# EAGLE board PCB (EAGLE 9.7.0)
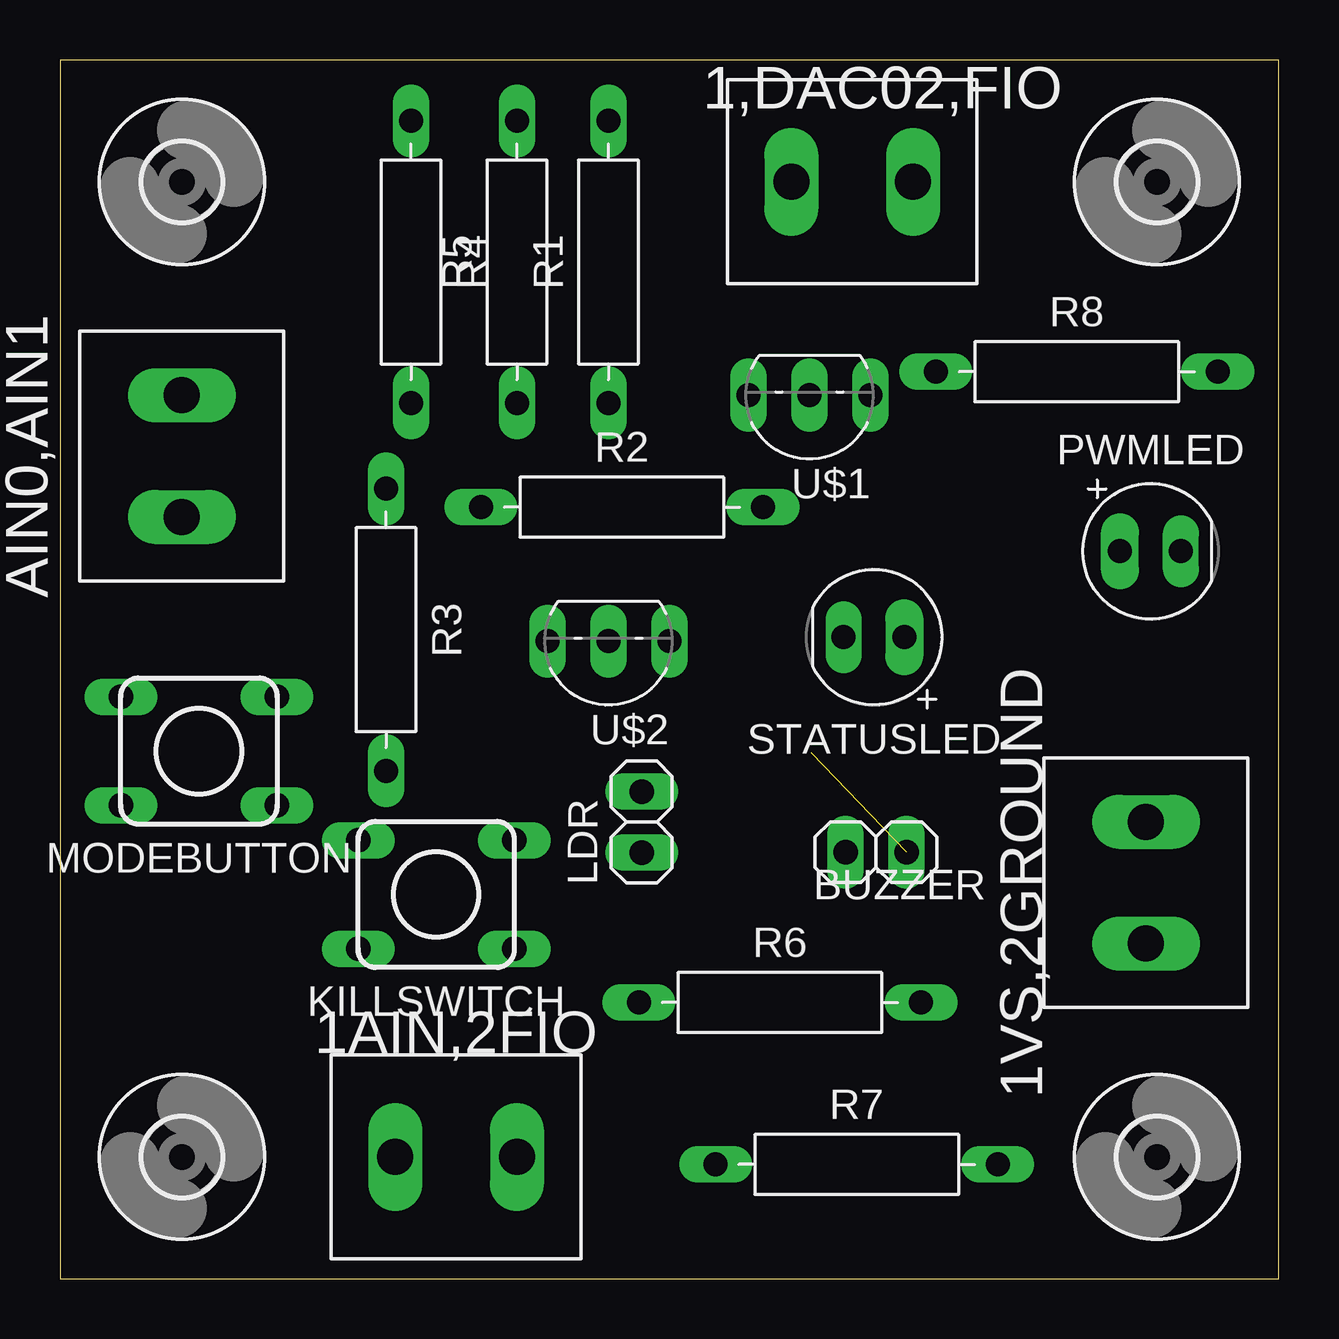
[diagram p0: board, top side]
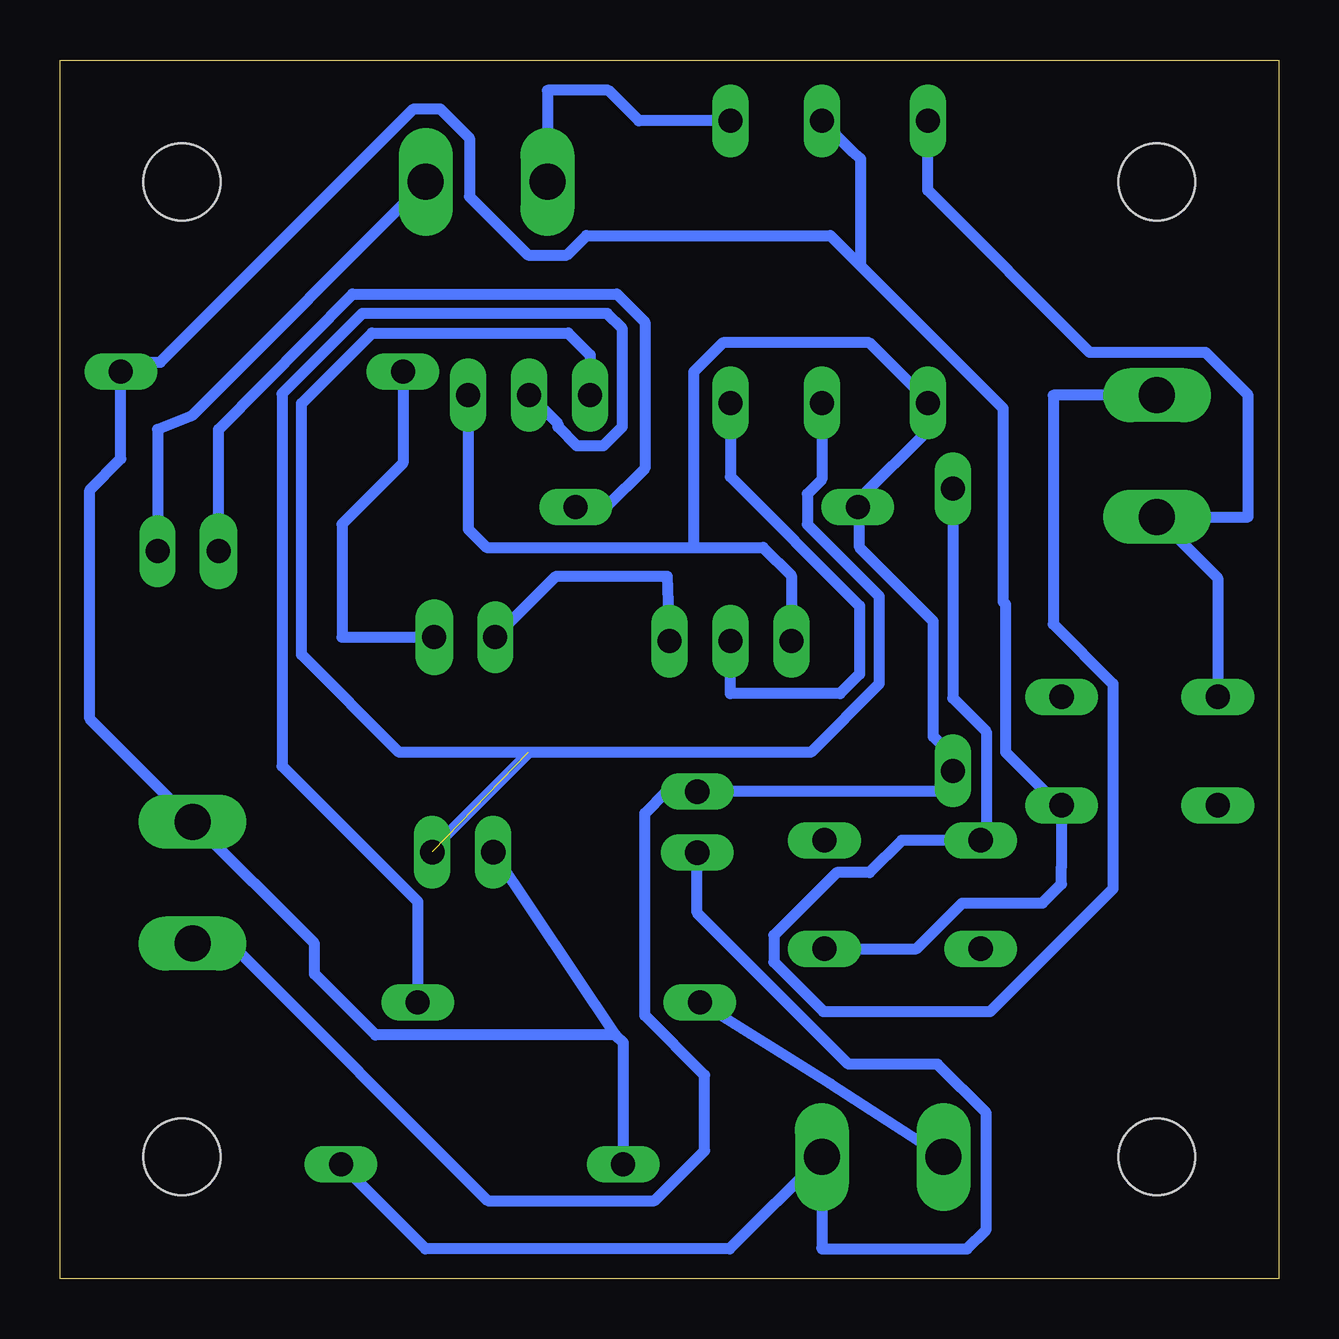
[diagram p1: board, bottom side, seen from below]

Size 50.8 x 50.8 mm. Coordinates in mm from the lower left corner, seen from the top.
Outline: 0,0 50.8,0 50.8,50.8 0,50.8 0,0
Copper layers (1*16): Top / Bottom
Stack-up Default Layer Stack: Top SilkScreen Epoxy Ink / Top SolderMask SR:Green 0.0254mm Dk 4.3 / Top Surface Finish Lead-Free 0.02mm / Top CuFoil:007 0.035mm / Dielectric-1 User Defined 1.5mm / Bottom CuFoil:007 0.035mm / Bottom Surface Finish Lead-Free 0.02mm / Bottom SolderMask SR:Green 0.0254mm Dk 4.3 / Bottom SilkScreen Epoxy Ink
Design rules: minimum copper width 18mil, minimum drill size 1mm, copper clearance wire_polygon to wire_polygon 14mil, copper clearance wire_polygon to pad_smd 14mil, copper clearance wire_polygon to via 14mil, copper clearance pad_smd to pad_smd 14mil, copper clearance pad_smd to via 14mil, copper clearance via to via 14mil, copper clearance smd to pad (same net) 14mil, copper clearance smd to via (same net) 14mil, copper clearance smd to smd (same net) 14mil, dimension clearance 40mil, via restrict clearance 0mil, restrict clearance 0mil, drill distance 6mil, keepout clearance 0mil

## Footprints (pad centres in the part's own frame; a part is rotated, then mirrored left to right if it is on the bottom)
TERMBLK_508-2N = drill 1.5 pad 2.184 long: 1 0,0; 2 5.08,0
1X02 = drill 1.016 pad 1.524 long: 1 -1.27,0; 2 1.27,0
3,2 = hole 3.2: 0,0
SWITCH-MOMENTARY-PTH-6.5MM = drill 1.016 pad 1.524 long: 1 -3.251,2.261; 2 3.251,2.261; 3 -3.251,-2.261; 4 3.251,-2.261
LEDRD254W60D565H860B_R = drill 1 pad 1.581 long: A -1.27,0 | drill 1 pad 1.327 long: C 1.27,0
RESAD1176W63L850D250B = drill 1 pad 1.524 long: 1 -5.88,0; 2 5.88,0
TO92-EBC = drill 1 pad 1.524 long: B 0,-1.27; C 2.54,-1.27; E -2.54,-1.27

## Placement (x,y rotation side)
1,DAC02,FIO  TERM-BLK-2P  [TERMBLK_508-2N]  35.56,45.72 180 top
1AIN,2FIO  TERM-BLK-2P  [TERMBLK_508-2N]  19.05,5.08 180 top
1VS,2GROUND  TERM-BLK-2P  [TERMBLK_508-2N]  45.27,19.05 270 top
AIN0,AIN1  TERM-BLK-2P  [TERMBLK_508-2N]  5.08,36.83 270 top
BUZZER  PINHD-1X2  [1X02]  34.01,17.78 0 top
H1  MOUNT-HOLE3.2  [3,2]  45.72,45.72 0 top
H2  MOUNT-HOLE3.2  [3,2]  5.08,5.08 0 top
H3  MOUNT-HOLE3.2  [3,2]  45.72,5.08 0 top
H4  MOUNT-HOLE3.2  [3,2]  5.08,45.72 0 top
KILLSWITCH  PUSH_BUTTON  [SWITCH-MOMENTARY-PTH-6.5MM]  15.68,16.02 180 top
LDR  PINHD-1X2  [1X02]  24.24,19.04 90 top
MODEBUTTON  PUSH_BUTTON  [SWITCH-MOMENTARY-PTH-6.5MM]  5.79,21.99 180 top
PWMLED  LED-RED  [LEDRD254W60D565H860B_R]  45.46,30.32 0 top
R1  470  [RESAD1176W63L850D250B]  22.86,42.38 90 top
R2  470  [RESAD1176W63L850D250B]  23.42,32.16 0 top
R3  10k  [RESAD1176W63L850D250B]  13.59,27.05 270 top
R4  10k  [RESAD1176W63L850D250B]  14.63,42.38 270 top
R5  1k  [RESAD1176W63L850D250B]  19.05,42.38 90 top
R6  470  [RESAD1176W63L850D250B]  30.01,11.52 0 top
R7  10k  [RESAD1176W63L850D250B]  33.21,4.77 0 top
R8  330  [RESAD1176W63L850D250B]  42.38,37.8 0 top
STATUSLED  LED-RED  [LEDRD254W60D565H860B_R]  33.93,26.74 180 top
U$1  BJT_NPN2N3904  [TO92-EBC]  31.24,35.56 180 top
U$2  BJT_PNP2N3906  [TO92-EBC]  22.86,25.31 180 top

## Library data of the parts
1,DAC02,FIO 1AIN,2FIO 1VS,2GROUND AIN0,AIN1 = SEMET 1; CATEGORY: Fixed Terminal Blocks; DESCRIPTION: Fixed Terminal Blocks 5.08MM PCB MOUNT 2P; MANUFACTURER: TE Connectivity AMP Connectors; MPN: 282837-2; OPERATING_TEMPERATURE: -40°C to +105°C; PART_STATUS: ACTIVE; PITCH: 0.200" (5.08mm); ROHS_COMPLIANCE: RoHS Compliant; SERIES: Buchanan; SUBCATEGORY: Terminal Blocks; TYPE: Through Hole; Screw - Rising Cage Clamp; Side wire entry, Horizontal with Board
BUZZER LDR = SEMET 1; CATEGORY: Headers; DESCRIPTION: Header, Straight, 2 Position; MANUFACTURER: Generic; MPN: Generic; OPERATING_TEMPERATURE: Generic; PART_STATUS: Active; PITCH: 0.100" (2.54mm); ROHS_COMPLIANCE: Generic; SERIES: Generic; SUB-CATEGORY: Headers, Male Pins; TYPE: Board to Board or Cable, Unshrouded, Through Hole, Straight
H1-H4 KILLSWITCH MODEBUTTON PWMLED STATUSLED U$1 U$2 = SEMET 1
R1-R8 = SEMET 1; CATEGORY: Resistor; SUB-CATEGORY: Fixed

## Nets
N$1: PWMLED.A R2.2
N$2: AIN0,AIN1.1 KILLSWITCH.4 R3.1
N$3: 1VS,2GROUND.1 BUZZER.1 KILLSWITCH.1 MODEBUTTON.1 R5.2 R7.1 R8.2
N$4: 1,DAC02,FIO.1 PWMLED.C
N$5: STATUSLED.C U$2.E
N$6: 1AIN,2FIO.1 LDR.1 R7.2
N$8: R8.1 STATUSLED.A
N$9: AIN0,AIN1.2 MODEBUTTON.4 R4.1
N$10: R1.1 U$2.B
N$11: 1,DAC02,FIO.2 R1.2
N$12: 1VS,2GROUND.2 LDR.2 R2.1 R3.2 R4.2 U$1.E U$2.C
N$13: BUZZER.2 R5.1 U$1.C
N$14: R6.2 U$1.B
N$15: 1AIN,2FIO.2 R6.1

## Tracks (layer width: path | path; a pad name or v marks a point on that pad's centre or on a via)
N$1
  Bottom 0.457: PWMLED.A 44.19,35.4 38.61,41.05 27.58,41.05 26.42,39.88 26.42,33.77 28.03,32.16 R2.2
N$2
  Bottom 0.457: R3.1 13.59,24.2 12.19,22.81 12.19,18.29 KILLSWITCH.4 15.71,18.28 17.05,16.93 18.43,16.93 21.04,14.31 21.04,13.2 18.98,11.14 12.03,11.14 6.91,16.26 6.91,24.79 9.4,27.28 9.4,36.83 AIN0,AIN1.1
N$3
  Bottom 0.457: 17.42,42.22 17.42,46.69 17.78,46.99 R5.2 | 17.42,42.22 18.69,43.48 28.85,43.48 29.67,42.67 31.29,42.67 33.73,45.11 33.73,47.55 34.95,48.77 36.05,48.77 46.62,38.2 48.26,38.2 R8.2 48.26,34.18 49.55,32.88 49.55,23.34 1VS,2GROUND.1 40.19,13.97 40.19,12.7 37.65,10.16 27.64,10.16 | 27.64,10.16 27.64,10.15 27.33,9.85 R7.1 | 27.64,10.16 BUZZER.1 | KILLSWITCH.1 15.1,13.76 13.19,15.66 9.84,15.66 9.05,16.45 9.05,17.18 9.04,17.19 MODEBUTTON.1 9.35,19.91 11.38,21.95 11.38,28.11 11.48,28.21 11.48,36.27 17.42,42.22
N$4
  Bottom 0.457: 1,DAC02,FIO.1 45.32,35.96 46.73,35.4 PWMLED.C
N$5
  Bottom 0.457: STATUSLED.C 30.12,29.28 25.5,29.28 U$2.E
N$6
  Bottom 0.457: R7.2 35.57,1.25 22.89,1.25 1AIN,2FIO.1 19.05,1.27 19.02,1.25 12.99,1.25 12.19,2.05 12.19,6.91 14.22,8.94 17.93,8.94 24.24,15.25 LDR.1
N$8
  Bottom 0.457: STATUSLED.A 39.04,26.74 39.04,31.45 36.5,33.99 R8.1
N$9
  Bottom 0.457: MODEBUTTON.4 2.54,29.21 AIN0,AIN1.2 1.27,31.75 1.27,36.83 3.05,38.61 7.87,38.61 14.63,45.36 R4.1
N$10
  Bottom 0.457: R1.1 22.86,33.43 17.48,28.04 17.48,25.2 18.29,24.38 22.86,24.38 U$2.B
N$11
  Bottom 0.457: R1.2 26.67,48.26 27.94,49.53 30.48,49.53 1,DAC02,FIO.2
N$12
  Bottom 0.457: 24.38,30.48 33.02,30.48 33.78,31.24 U$1.E | 24.38,30.48 21.49,30.48 20.32,29.31 U$2.C | 1VS,2GROUND.2 43.69,13.97 32.97,3.25 26.01,3.25 23.93,5.33 23.93,8.48 26.42,10.97 26.42,19.4 25.51,20.31 LDR.2 23.98,20.32 13.59,20.32 R3.2 13.59,21.78 14.4,22.6 14.4,27.4 17.48,30.48 17.48,32.11 R2.1 17.48,32.51 14.63,35.36 R4.2 14.63,36.58 17.07,39.01 23.16,39.01 24.38,37.8 24.38,30.48
N$13  (1 unrouted)
  Bottom 0.457: U$1.C 28.7,38.51 29.62,39.42 37.8,39.42 40.73,36.49 40.73,26.01 36.66,21.95 31.29,21.95 | R5.1 19.05,33.32 19.65,32.71 19.65,31.44 16.66,28.45 16.66,24.79 19.51,21.95 31.24,21.95 35.36,17.83 35.36,17.7 35.28,17.63 BUZZER.2
N$14
  Bottom 0.457: R6.2 35.89,15.72 41.54,21.37 41.54,36.89 38.2,40.23 27.99,40.23 27.36,39.6 27.36,35.51 28.14,34.72 29.26,34.72 30.05,35.51 30.05,35.64 U$1.B
N$15
  Bottom 0.457: R6.1 18.69,8.13 1AIN,2FIO.2